# Altium PCB iR-Blaster.PcbDoc (part 2 of 2)
Units mil, origin at the board's own origin, x right, y up, seen from the top; angles counter-clockwise.
Board outline 1958.66 x 1633.86 mil, 2 copper layers (Top Layer, Bottom Layer), stack 62.205 mil thick; 49 components, 31 nets, 174 pads, 63 vias.
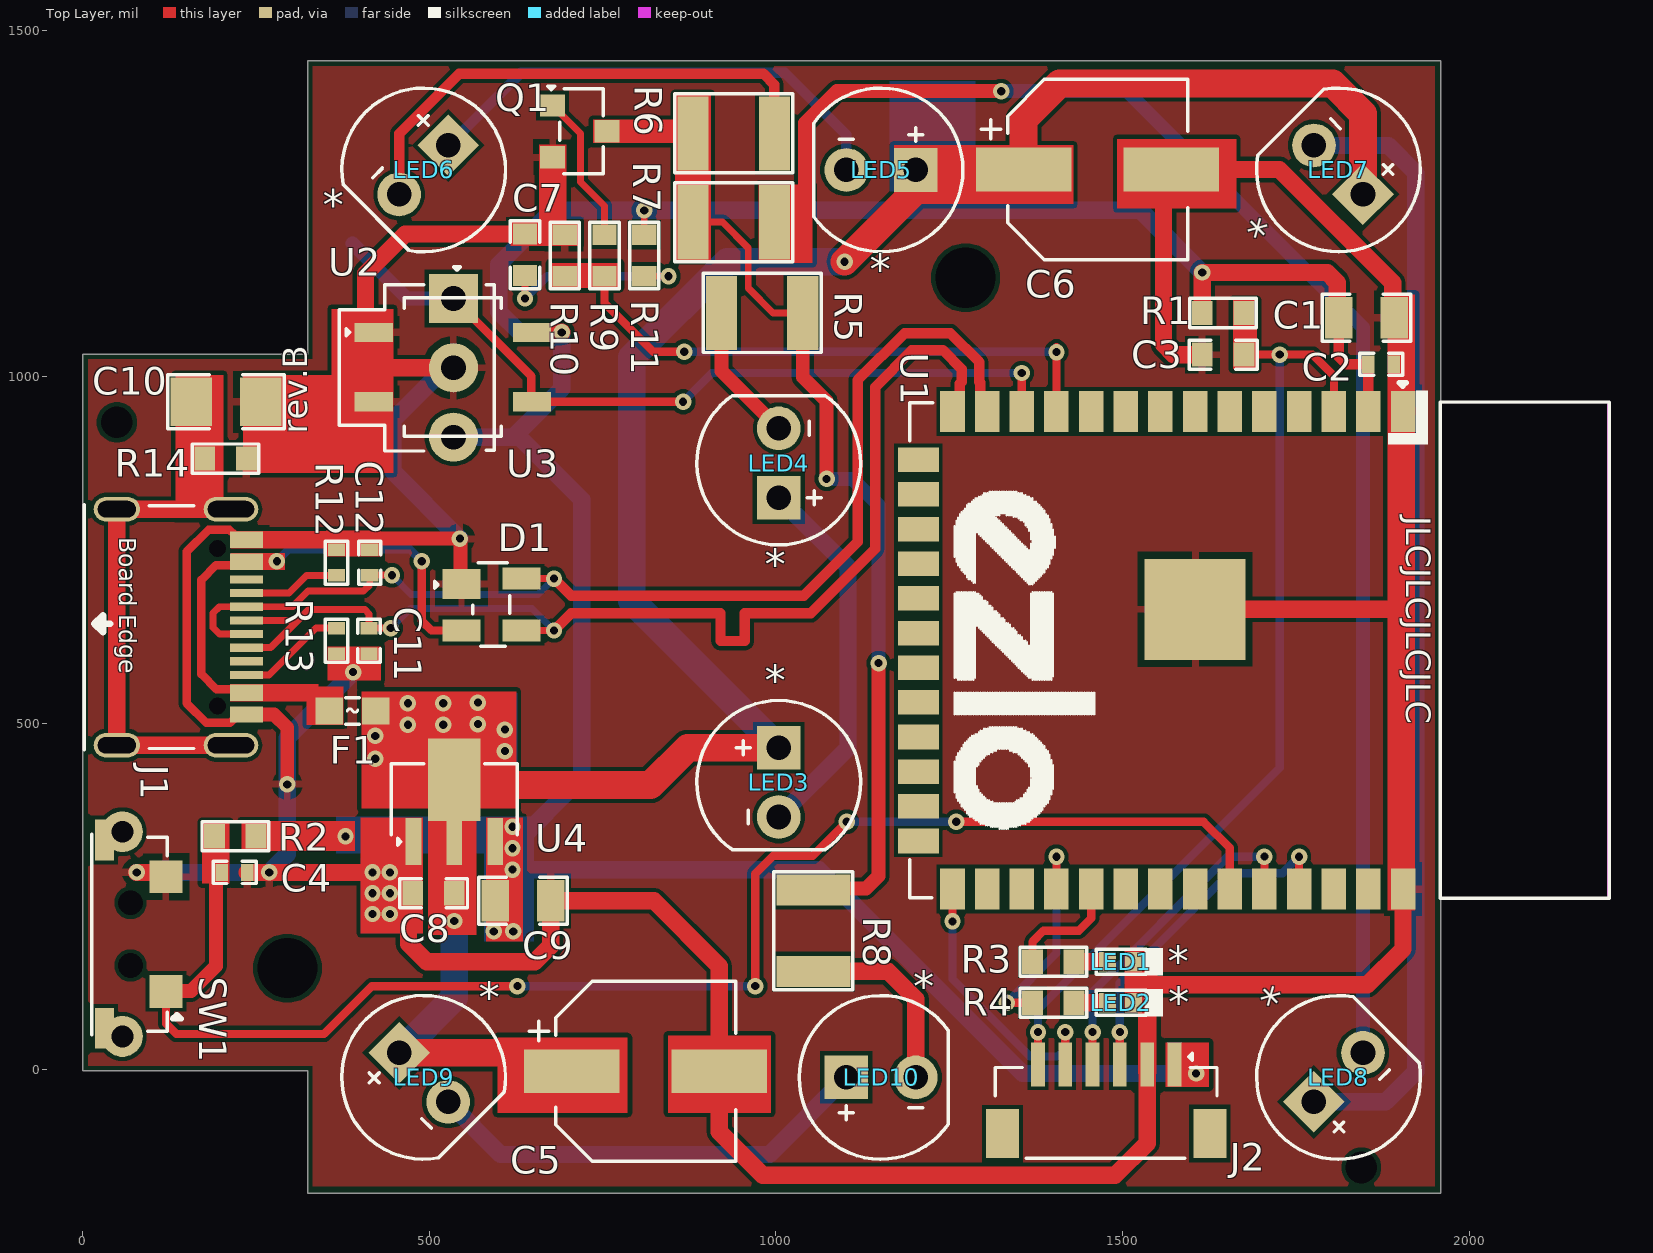
[diagram p0: Top Layer view]

## Silkscreen, mask and mechanical layers (free items; w line width, h text height) (continued)
Drill Drawing: (continued)
  text "Symbol" at -883.5,4500.94 h72
  text "Count" at -377.62,4500.94 h72
  text "Hole Size" at 162.24,4500.94 h72
  text "Plated" at 1261.92,4500.94 h72
  text "Hole Type" at 1767.79,4500.94 h72
  text "Drill Layer Pair" at 2501.59,4500.94 h72
  text "Via/Pad" at 4001.14,4500.94 h72
  text "Pad Shape" at 4590.99,4500.94 h72
  text "Template" at 5336.79,4500.94 h72
  text "Description" at 6476.46,4500.94 h72
  text "Hole Tolerance (+)" at 7330.22,4500.94 h72
  text "Hole Tolerance (-)" at 8663.83,4500.94 h72
  text "2" at -377.62,4350.94 h60
  text "23.62mil (0.600mm)" at 162.24,4350.94 h60
  text "PTH" at 1261.92,4350.94 h60
  text "Slot" at 1767.79,4350.94 h60
  text "Top Layer - Bottom Layer" at 2501.59,4350.94 h60
  text "Pad" at 4001.14,4350.94 h60
  text "Rounded" at 4590.99,4350.94 h60
  text "r90_170h60_140r100" at 5336.79,4350.94 h60
  text "2" at -377.62,4200.94 h60
  text "23.62mil (0.600mm)" at 162.24,4200.94 h60
  text "PTH" at 1261.92,4200.94 h60
  text "Slot" at 1767.79,4200.94 h60
  text "Top Layer - Bottom Layer" at 2501.59,4200.94 h60
  text "Pad" at 4001.14,4200.94 h60
  text "Rounded" at 4590.99,4200.94 h60
  text "(Mixed)" at 5336.79,4200.94 h60
  text "2" at -377.62,4050.94 h60
  text "24.41mil (0.620mm)" at 162.24,4050.94 h60
  text "NPTH" at 1261.92,4050.94 h60
  text "Round" at 1767.79,4050.94 h60
  text "Top Layer - Bottom Layer" at 2501.59,4050.94 h60
  text "Pad" at 4001.14,4050.94 h60
  text "Rounded" at 4590.99,4050.94 h60
  text "c0hn62" at 5336.79,4050.94 h60
  text "2" at -377.62,3900.94 h60
  text "31.50mil (0.800mm)" at 162.24,3900.94 h60
  text "PTH" at 1261.92,3900.94 h60
  text "Round" at 1767.79,3900.94 h60
  text "Top Layer - Bottom Layer" at 2501.59,3900.94 h60
  text "Pad" at 4001.14,3900.94 h60
  text "Rounded" at 4590.99,3900.94 h60
  text "c150h80" at 5336.79,3900.94 h60
  text "2" at -377.62,3750.94 h60
  text "35.43mil (0.900mm)" at 162.24,3750.94 h60
  text "NPTH" at 1261.92,3750.94 h60
  text "Round" at 1767.79,3750.94 h60
  text "Top Layer - Bottom Layer" at 2501.59,3750.94 h60
  text "Pad" at 4001.14,3750.94 h60
  text "Rounded" at 4590.99,3750.94 h60
  text "c0hn90" at 5336.79,3750.94 h60
  text "2" at -377.62,3600.94 h60
  text "45.67mil (1.160mm)" at 162.24,3600.94 h60
  text "NPTH" at 1261.92,3600.94 h60
  text "Round" at 1767.79,3600.94 h60
  text "Top Layer - Bottom Layer" at 2501.59,3600.94 h60
  text "Pad" at 4001.14,3600.94 h60
  text "Rounded" at 4590.99,3600.94 h60
  text "c0hn116" at 5336.79,3600.94 h60
  text "2" at -377.62,3450.94 h60
  text "86.61mil (2.200mm)" at 162.24,3450.94 h60
  text "NPTH" at 1261.92,3450.94 h60
  text "Round" at 1767.79,3450.94 h60
  text "Top Layer - Bottom Layer" at 2501.59,3450.94 h60
  text "Pad" at 4001.14,3450.94 h60
  text "Rounded" at 4590.99,3450.94 h60
  text "c0hn220" at 5336.79,3450.94 h60
  text "3" at -377.62,3300.94 h60
  text "35.43mil (0.900mm)" at 162.24,3300.94 h60
  text "PTH" at 1261.92,3300.94 h60
  text "Round" at 1767.79,3300.94 h60
  text "Top Layer - Bottom Layer" at 2501.59,3300.94 h60
  text "Pad" at 4001.14,3300.94 h60
  text "(Mixed)" at 4590.99,3300.94 h60
  text "(Mixed)" at 5336.79,3300.94 h60
  text "16" at -377.62,3150.94 h60
  text "35.43mil (0.900mm)" at 162.24,3150.94 h60
  text "PTH" at 1261.92,3150.94 h60
  text "Round" at 1767.79,3150.94 h60
  text "Top Layer - Bottom Layer" at 2501.59,3150.94 h60
  text "Pad" at 4001.14,3150.94 h60
  text "(Mixed)" at 4590.99,3150.94 h60
  text "(Mixed)" at 5336.79,3150.94 h60
  text "63" at -377.62,3000.94 h60
  text "11.81mil (0.300mm)" at 162.24,3000.94 h60
  text "PTH" at 1261.92,3000.94 h60
  text "Round" at 1767.79,3000.94 h60
  text "Top Layer - Bottom Layer" at 2501.59,3000.94 h60
  text "Via" at 4001.14,3000.94 h60
  text "Rounded" at 4590.99,3000.94 h60
  text "v60h30" at 5336.79,3000.94 h60
  text "96 Total" at -377.62,2850.94 h60
  text "Slot definitions :" at -883.5,2705.97 h60
  text "Routed Path Length" at 149.19,2705.97 h60
  text "= Calculated from tool start centre position to tool end centre position." at 1251.86,2705.97 h60
  text "Hole Length" at 149.19,2605.99 h60
  text "= Routed Path Length + Tool Size = Slot length as defined in the PCB layout" at 841.99,2605.99 h60

## Dimensions
0,1032.63 to 0,-0.83 on Dimension
324.8,1455.86 to 0,1032.63 on Dimension
324.8,-178 to 0,-0.83 on Dimension
1958.66,1455.86 to 1958.66,-178 on Dimension
1958.66,1455.86 to 324.8,1455.86 on Dimension

## Text inside footprints (layer, text, board x,y; h text height)
J1: Top Overlay "Board Edge" at 52.55,768.72 h25 r270